# Altium PCB LED_Round.PcbDoc
Units mil, origin at the board's own origin, x right, y up, seen from the top; angles counter-clockwise.
Board outline 3150.16 x 1402.36 mil, 2 copper layers (Top Layer, Bottom Layer), stack 57 mil thick; 14 components, 10 nets, 28 pads, 11 vias.
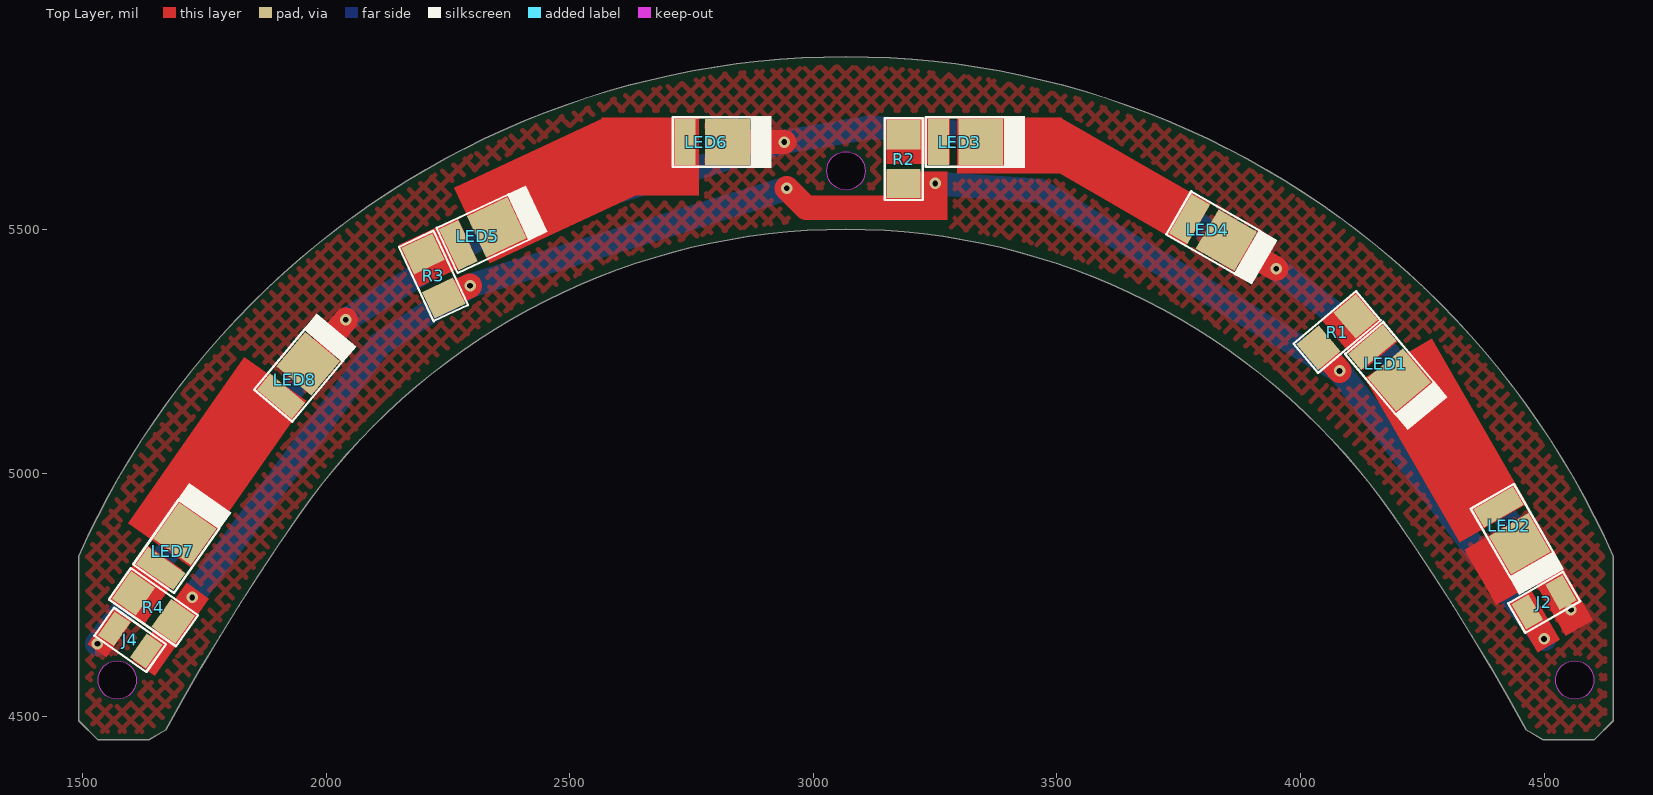
[diagram p0: Top Layer view]
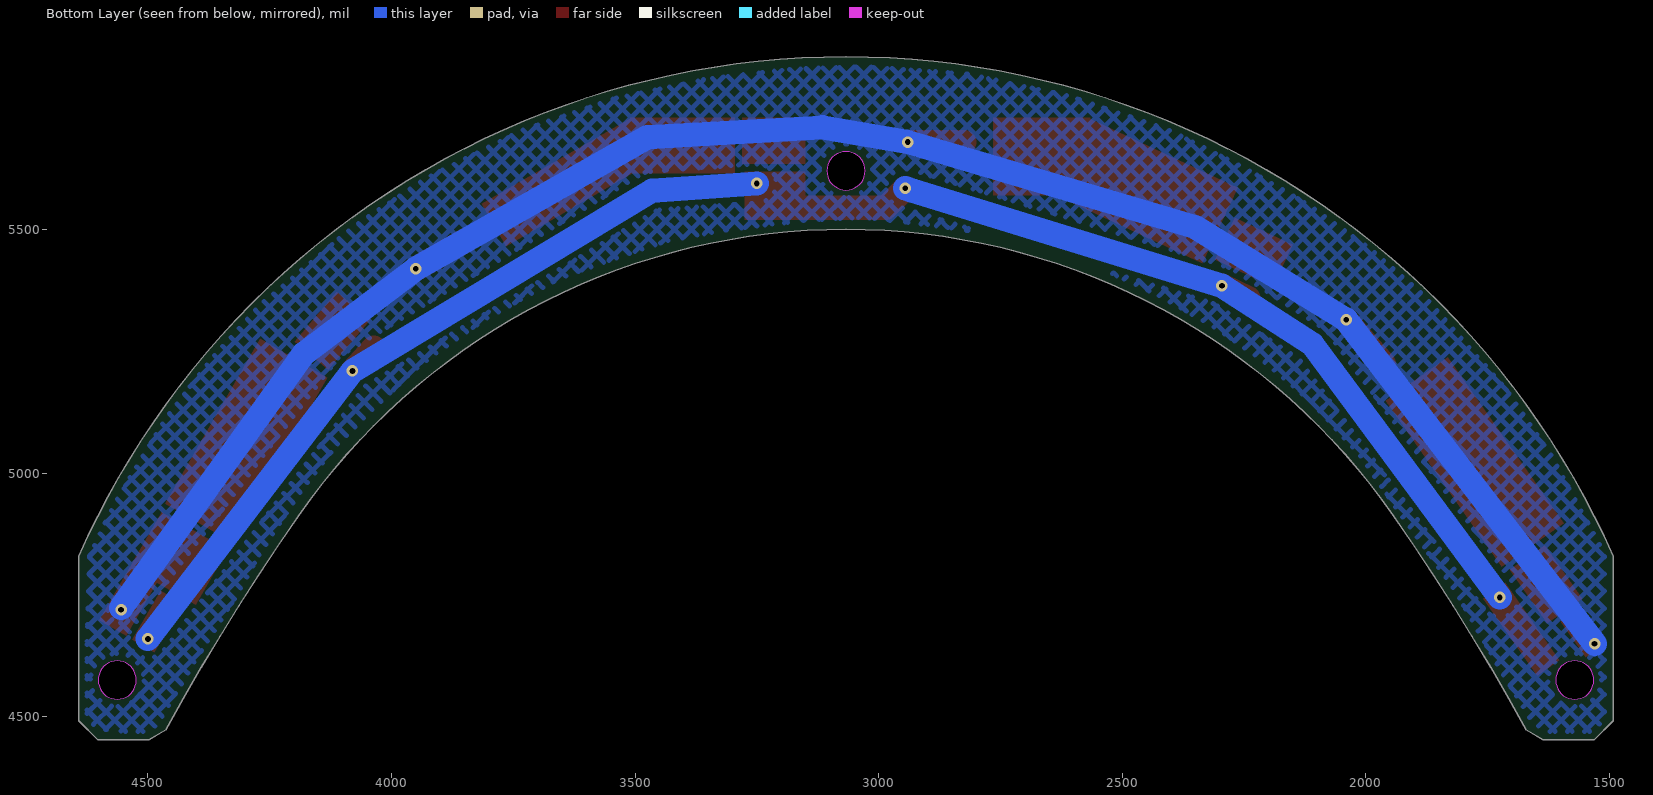
[diagram p1: Bottom Layer view, seen from below]

## Layer stack, top to bottom
Top Solder: solder mask 3, Solder Resist, Dk 3.5
Top Layer: signal copper 10
Dielectric 1: dielectric 37, FR-4, Dk 4.8
Bottom Layer: signal copper 10
Bottom Solder: solder mask 3, Solder Resist, Dk 3.5

## Board outline
1531.15,4452.69 1491.78,4492.06 1491.78,4829.69 cw(c3066.86,4132.61) 4641.95,4829.69 4641.95,4492.06 4602.58,4452.69 4498.07,4452.69 4463.58,4473.07 ccw(c96.07,2067.42) 4190.21,4913.52 ccw(c3066.86,4132.61) 1943.52,4913.52 ccw(c6037.66,2067.42) 1670.15,4473.07 1635.66,4452.69
cut-out: 4562.93,4536.16 cw(c4562.93,4575.53) 4523.56,4575.53 cw(c4562.93,4575.53) 4562.93,4614.9 cw(c4562.93,4575.53) 4602.3,4575.53 cw(c4562.93,4575.53)
cut-out: 1570.8,4536.16 cw(c1570.8,4575.53) 1531.43,4575.53 cw(c1570.8,4575.53) 1570.8,4614.9 cw(c1570.8,4575.53) 1610.17,4575.53 cw(c1570.8,4575.53)
cut-out: 3066.86,5581.43 cw(c3066.86,5620.8) 3027.49,5620.8 cw(c3066.86,5620.8) 3066.86,5660.17 cw(c3066.86,5620.8) 3106.23,5620.8 cw(c3066.86,5620.8)

## Design rules (kind name [scope] priority, off if disabled: settings)
Clearance [All] p1: gap=10 ignorepadtopadclearanceinfootprint=FALSE except(0: Arc-Hole Track-Hole SMDPad-Hole THPad-Hole Via-Hole Fill-Hole Poly-Hole Region-Hole Text-Hole)
ComponentClearance [All] p1: gap=0 collisioncheckmode=3 verticalgap=0 showdistances=FALSE
HoleSize [All] p1: absolutevalues=TRUE maxlimit=1000 minlimit=1 maxpercent=80.000 minpercent=20.000
HoleToHoleClearance [All] p1: gap=0 allowstackedmicrovias=TRUE
MinimumSolderMaskSliver [All] p1: minsoldermaskwidth=0
PolygonConnect [All] p1: thpad.connectstyle=Relief thpad.reliefconductorwidth=10 thpad.reliefentries=4 thpad.polygonreliefangle="90 Angle" thpad.airgapwidth=10 smdpad.connectstyle=Direct smdpad.reliefconductorwidth=10 smdpad.reliefentries=4 smdpad.polygonreliefangle="90 Angle" smdpad.airgapwidth=10 via.connectstyle=Relief via.reliefconductorwidth=10 via.reliefentries=4 via.polygonreliefangle="90 Angle" via.airgapwidth=10
RoutingVias [All] p1: holewidth=11.81 width=23.62 viastyle="Through Hole" minholewidth=11.81 minwidth=23.62 maxholewidth=11.81 maxwidth=23.62
SilkToSilkClearance [All] p1: silktosilkclearance=0
SilkToSolderMaskClearance [IsPad] p1: minsilkscreentomaskgap=0 clearancetoexposedcopper=TRUE
SolderMaskExpansion SolderMaskExpansion_1 [Not IsVia] p1: expansion=4
SolderMaskExpansion [IsVia] p2: expansion=4 soldermaskfromhole=TRUE
Width [All] p1: maxlimit=50 minlimit=22 preferedwidth=22
24 further rules are at their usual default settings.

## Components (designator, comment, footprint, x,y, rotation, side; value= is the part's Value field where it differs from the comment)
J2 "SMD PADS" "SMD PAD" 4500,4735 r30 top
J4 "SMD PADS" "SMD PAD" 1597.23,4657.94 r145 top
LED1 "White LED" "White LED" 4175,5225 r310 top value=Custom
LED2 "White LED" "White LED" 4428.2,4892.76 r300 top value=Custom
LED3 "White LED" "White LED" 3300,5680 r0 top value=Custom
LED4 "White LED" "White LED" 3810,5500 r330 top value=Custom
LED5 "White LED" "White LED" 2310.48,5486.57 r25 top value=Custom
LED6 "White LED" "White LED" 2780,5680 r0 top value=Custom
LED7 "White LED" "White LED" 1685,4840 r55 top value=Custom
LED8 "White LED" "White LED" 1935,5191.6 r50 top value=Custom
R1 "5R1" Res1206 4075,5290 r220 top
R2 "5R1" Res1206 3185,5645 r270 top
R3 "5R1" Res1206 2220,5405 r295 top
R4 "5R1" Res1206 1645,4725 r325 top

## Footprints (in the part's own frame and the unit in brackets; to place one, negate y for a bottom-side part, rotate by r counter-clockwise, add the part's x,y. Pads: shape width x height; smd on the part's side, far side on the other; paste and mask are expansions set on the pad)
Res1206 [mil]
  rect 60x70 smd: 1(-50,0) 2(50,0)
  silkscreen extent -84,-39 84,39, body extent -63,-31 63,32, height 39
"SMD PAD" [mil] "SMD 0805"
  rect 40x60 smd: 1(-40,0) 2(40,0)
  silkscreen extent -65,-35 65,35
"White LED" [mm]
  rect 2.33x2.38 smd: 1(1.108,0)
  rect 1.1x2.38 smd: 2(-1.107,0)
  silkscreen extent -1.75,-1.35 3.4,1.35

## Part data
J2 J4: library part "SMD PAD"
LED1 LED2 LED3 LED4 LED5 LED6 LED7 LED8: library part HL-AM-2835H421W-S1-08-HR6(SDCM<6)(2800K-3100K)60mA, "White 2800K~3100K 2.8V~3.4V SMD,3.5x2.8x0.7mm Light Emitting Diodes (LED) RoHS", Manufacturer="HONGLITRONIC(Hongli Zhihui (HONGLITRONIC))", Package=Custom, ComponentLink1Description="Supplier Link", ComponentLink1URL=https://lcsc.com/product-detail/Light-Emitting-Diodes-LED_HONGLITRONIC-Hongli-Zhihui-HONGLITRONIC-HL-AM-2835H421W-S1-08-HR6-SDCM-6-2800K-3100K-60mA_C516131.html, Manufacturer Part No=HL-AM-2835H421W-S1-08-HR6(SDCM<6)(2800K-3100K)60mA
R1 R2 R3 R4: library part 1206W4J051JT5E, "RES SMD 5.1O ±5% 0.25W 1206", Manufacturer="UNI-ROYAL(Uniroyal Elec)", Package=1206, Power(Watts)=0.25W, Resistance=5.1O, Temperature Coefficient=±400ppm/?, Tolerance=±5%

## Via types
v1: diameter 23.62, hole 11.81, Top Layer to Bottom Layer, tented both sides, 11 vias

## Nets (pads, with @x,y where several pads share a name; then routed paths per layer and width w, separated by ;. In a path a pad name is that pad's centre, name@x,y a point inside that pad or via, vN(x,y) a via of type N, cw(c..) or ccw(c..) an arc to the next point about the centre after c; other vN are vias at no path point)
GND: J2.2 J4.2 LED2.1 LED4.1 LED6.1 LED8.1 | length 4185.6
  Top Layer w50: LED8.1 v1(2040,5315) ; LED6.1 v1(2940,5680) ; LED4.1 v1(3950,5420)
  Bottom Layer w50: v1(1530,4650) v1(2040,5315) 2350.38,5505.61 v1(2940,5680) 3115,5710 3475,5690 v1(3950,5420) 4180,5245 4553.84,4724.95 v1@4555,4723.34
  other v1: 4555,4720
LED_IN: J2.1 J4.1 R1.2 R2.2 R3.2 R4.2 | length 3573.6
  Top Layer w50: R3.2 v1(2295,5385) ; v1(2945,5585) 2985,5545 3205,5545 ; R1.2 v1(4080,5210)
  Bottom Layer w50: v1(1725,4745) 2109.9,5265.1 v1(2295,5385) 2930,5580 v1(2945,5585) ; v1(3250,5595) 3465,5580 v1(4080,5210) v1(4500,4660)
NetLED1_1: LED1.1 LED2.2
NetLED1_2: LED1.2 R1.1
NetLED3_1: LED3.1 LED4.2
NetLED3_2: LED3.2 R2.1
NetLED5_1: LED5.1 LED6.2
NetLED5_2: LED5.2 R3.1
NetLED7_1: LED7.1 LED8.2
NetLED7_2: LED7.2 R4.1

## Polygon pours and split planes (outlines as drawn)
GND on Top Layer "Polygon_2" (hatched 45Degree grid 25 track 10, remove dead copper, pour order 0): 1510,4495 1535,4470 1635,4470 1670,4505 1670,4510 1720,4590 1820,4765 1935,4925 2010,5035 2115,5150 2210,5230 2310,5300 2425,5365 2575,5435 2680,5468.15 2795,5495 2895,5510 3030,5525 3140,5520 3230,5510 3310,5500 3430,5478.2 3545,5440 3655,5400 3810,5315 3910,5245 3955,5210 4045,5125 4115,5055 4185,4965 4270,4835 4320,4745 4400,4620 4480,4485 4500,4470 4550,4470 4600,4475 4625,4495 4625,4645 4620,4830 4570,4935 4465.36,5110 4370,5235 4270,5345 4080,5505 3930,5605 3730,5705 3540,5770 3350,5810 3175,5830 3030,5835 2820,5820 2610,5775 2405,5705 2245,5625 2115,5550 1990,5460 1880,5365 1710,5170 1615,5030 1510,4835
GND on Bottom Layer "Polygon_2" (hatched 45Degree grid 25 track 10, remove dead copper, pour order 2): 1510,4495 1535,4470 1635,4470 1670,4505 1670,4510 1720,4590 1820,4765 1935,4925 2010,5035 2115,5150 2210,5230 2310,5300 2425,5365 2575,5435 2680,5468.15 2795,5495 2895,5510 3030,5525 3140,5520 3230,5510 3310,5500 3430,5478.2 3545,5440 3655,5400 3810,5315 3910,5245 3955,5210 4045,5125 4115,5055 4185,4965 4270,4835 4320,4745 4400,4620 4480,4485 4500,4470 4550,4470 4600,4475 4625,4495 4625,4645 4620,4830 4570,4935 4465.36,5110 4370,5235 4270,5345 4080,5505 3930,5605 3730,5705 3540,5770 3350,5810 3175,5830 3030,5835 2820,5820 2610,5775 2405,5705 2245,5625 2115,5550 1990,5460 1880,5365 1710,5170 1615,5030 1510,4835

## Other copper
Top Layer:
  rectangle net LED_IN: 3150,5520 3275,5620
  region net GND: 1600,4695 1561.08,4722.25 1509.86,4649.1 1548.78,4621.85
  region net GND: 4336.36,4843.26 4402.08,4729.44 4506.81,4789.91 4441.09,4903.73
  region net GND: 4600.28,4698.37 4471.99,4920.58 4416.12,4888.33 4544.41,4666.11
  region net LED_IN: 4486.65,4631.52 4532.7,4658.1 4474.28,4759.28 4428.24,4732.7
  region net NetLED1_1: 4326.63,4857.64 4465.11,4937.59 4269.47,5276.45 4130.99,5196.5
  region net NetLED1_2: 4129.97,5211.41 4199.36,5269.64 4112.45,5373.21 4043.06,5314.98
  rectangle net NetLED3_1: 3295,5615 3510,5730
  region net NetLED3_1: 3458.31,5642.43 3764.42,5465.7 3814.94,5553.2 3508.83,5729.94
  rectangle net NetLED3_2: 3150,5635 3280,5730
  rectangle net NetLED5_1: 2565,5570 2765,5730
  region net NetLED5_1: 2335,5430 2643.51,5573.86 2570.6,5730.22 2262.09,5586.36
  region net NetLED5_2: 2190.03,5382.04 2309.67,5437.82 2269.07,5524.88 2149.44,5469.09
  region net NetLED7_1: 1720.94,4807.83 1959.65,5148.74 1831.3,5238.61 1592.59,4897.7
  region net LED_IN: 1648.14,4583.8 1759.51,4742.84 1712.87,4775.5 1601.5,4616.45
  region net NetLED7_2: 1704.7,4801.7 1631.89,4852.68 1554.59,4742.3 1627.41,4691.31

## Silkscreen, mask and mechanical layers (free items; w line width, h text height)
Mechanical 2:
  circle w3.94: c1570.8,4575.53 r39.37
  circle w3.94: c4562.93,4575.53 r39.37
  circle w3.94: c3066.86,5620.8 r39.37
  lines w3.94: 1670,4472.98 cw(c6037.51,2067.33) 1943.37,4913.44 ; 1670.15,4473.07 1635.66,4452.69 1531.15,4452.69 1491.78,4492.06 1491.78,4829.69 cw(c3066.86,4132.61) 4641.95,4829.69 4641.95,4492.06 4602.58,4452.69 4498.07,4452.69 4463.58,4473.07 ccw(c96.07,2067.42) 4190.21,4913.52 ccw(c3066.86,4132.61) 1943.52,4913.52